# Altium PCB NB3000XN.PcbDoc (part 68 of 71)
Units mil, origin at the board's own origin, x right, y up, seen from the top; angles counter-clockwise.
Board outline 9527.56 x 6929.77 mil, 6 copper layers (Top Layer, GND+SHIELD, MidLayer1, MidLayer2, P2 - 3V3+5V0, Bottom Layer), stack 62.375 mil thick; 832 components, 1027 nets, 4655 pads, 4981 vias.
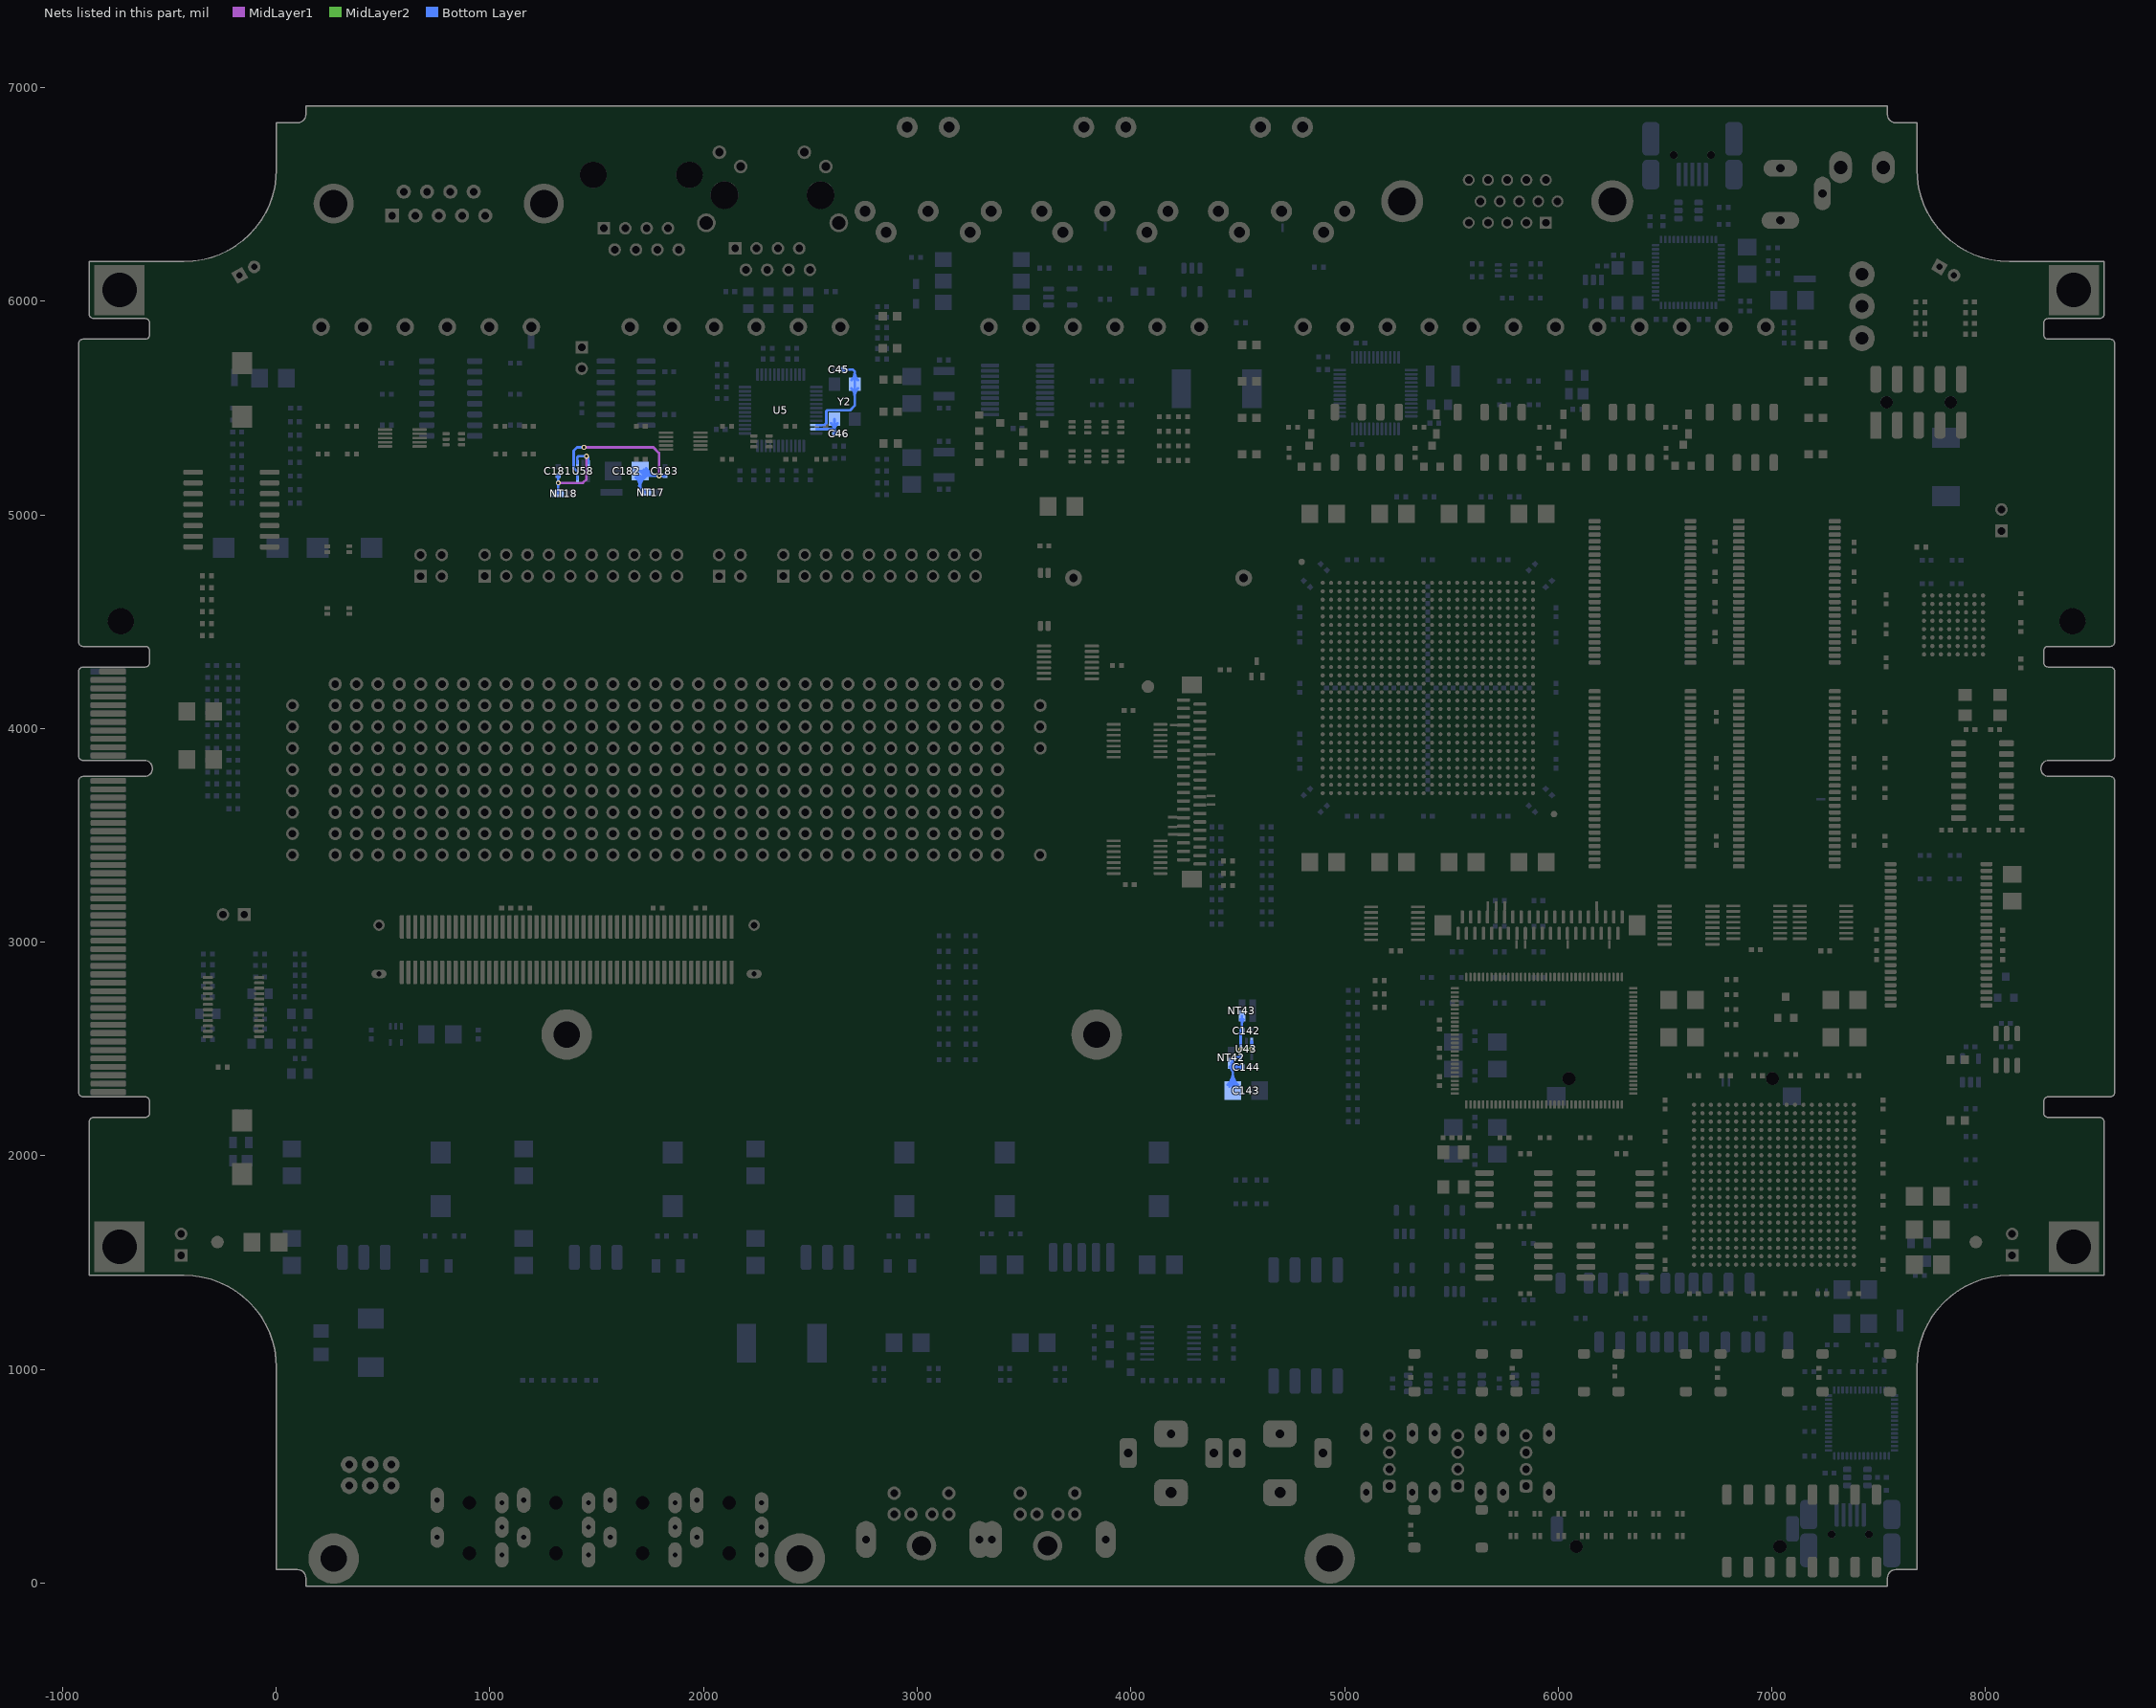
[diagram p72: the nets of this part, all layers, seen from the top]

## Via types
v1: diameter 23, hole 11.81, Top Layer to Bottom Layer, 3672 vias
v2: diameter 26, hole 11.81, Top Layer to Bottom Layer, 461 vias
v3: diameter 19, hole 11.81, Top Layer to Bottom Layer, tented both sides, 396 vias
v4: diameter 23.62, hole 11.81, Top Layer to Bottom Layer, 288 vias
v5: diameter 20, hole 11.81, Top Layer to Bottom Layer, 91 vias
v6: diameter 23, hole 11.81, Top Layer to Bottom Layer, tented both sides, 50 vias
v7: diameter 31, hole 11.81, Top Layer to Bottom Layer, 15 vias
v8: diameter 27.56, hole 11.81, Top Layer to Bottom Layer, tented both sides, 4 vias
v9: diameter 29, hole 11.81, Top Layer to Bottom Layer, 3 vias
v10: diameter 21, hole 11.81, Top Layer to Bottom Layer, 1 vias

## Nets (pads, with @x,y where several pads share a name; then routed paths per layer and width w, separated by ;. In a path a pad name is that pad's centre, name@x,y a point inside that pad or via, vN(x,y) a via of type N, cw(c..) or ccw(c..) an arc to the next point about the centre after c; other vN are vias at no path point) (continued)
VINA: C142.2 NT43.1 U43.1 U43.3 | length 405.5
  MidLayer2 w12: v1(4515.19,2500.04) v1(4565.19,2500.04) ; v1@4519.08,2496.15 cw(c4528.47,2486.76) 4528.47,2500.04 cw(c4528.47,2513.32) v1@4519.08,2503.93 ; v1@4561.3,2496.15 ccw(c4551.91,2486.76) 4551.91,2500.04 ccw(c4551.91,2513.32) v1@4561.3,2503.93
  Bottom Layer w12: NT43.1@4513.34,2637.78 cw(c4496.7,2621.14) 4520.24,2621.14 cw(c4543.77,2621.14) NT43.1@4527.13,2637.78 ; 4514.41,2515.2 ccw(c4530.35,2515.2) v1@4519.08,2503.93 ; 4514.41,2556.71 cw(c4548.6,2556.71) C142.2@4524.42,2580.89 ; v1(4515.19,2500.04) 4514.41,2500.82 U43.1@4514.41,2537.4 4514.41,2579.25 4520.24,2585.08 NT43.1@4520.24,2654.92 ; C142.2@4516.21,2589.11 ccw(c4506.48,2598.84) 4520.24,2598.84 ; 4520.24,2599.22 ccw(c4534.53,2599.22) C142.2@4524.42,2589.11 ; v1@4561.3,2503.93 ccw(c4550.95,2514.29) 4565.59,2514.29 ; v1@4565.59,2500.44 U43.3@4565.59,2537.4 ; 4565.59,2512.35 ccw(c4577.5,2512.35) v1@4569.08,2503.93
VINB: C181.2 NT18.1 U58.1 U58.3 | length 636.3
  MidLayer1 w12: v1(1319.92,5150.04) 1435.04,5150.04 1452.19,5167.19 v1(1452.19,5275.04) ; v1@1323.81,5146.15 cw(c1333.2,5136.76) 1333.2,5150.04 cw(c1333.2,5163.32) v1@1323.81,5153.93 ; v1@1448.3,5271.15 cw(c1438.91,5261.76) 1452.19,5261.76 cw(c1465.47,5261.76) v1@1456.08,5271.15
  Bottom Layer w12: NT18.1@1313.03,5106.66 ccw(c1296.2,5123.49) 1320,5123.49 ; C181.2@1315.89,5180.22 cw(c1305.97,5170.3) 1320,5170.3 cw(c1334.03,5170.3) C181.2@1324.11,5180.22 ; v1@1316.03,5146.15 cw(c1306.45,5136.57) 1320,5136.57 ; v1@1316.03,5153.93 ccw(c1306.45,5163.51) 1320,5163.51 ; NT18.1@1319.92,5099.76 1320,5099.84 1320,5150.04 C181.2@1320,5184.33 ; 1320,5123.11 ccw(c1343.27,5123.11) NT18.1@1326.81,5106.66 ; 1320,5136.95 cw(c1333.01,5136.95) v1@1323.81,5146.15 ; 1320,5163.13 ccw(c1333.01,5163.13) v1@1323.81,5153.93 ; U58.1@1409.41,5242.4 1409.41,5269.41 1415.04,5275.04 v1(1452.19,5275.04) 1460.59,5266.64 U58.3@1460.59,5242.4 ; v1@1448.3,5278.93 cw(c1438.91,5288.32) 1438.91,5275.04 cw(c1438.91,5261.76) 1448.3,5271.15 cw(c1418.63,5241.48) U58.3@1460.59,5241.48
VOUTA: C143.1 C144.2 NT42.2 U43.5 | length 639.8
  Bottom Layer w12: C143.1@4453.41,2332.53 ccw(c4396.45,2389.5) 4477.01,2389.5 ccw(c4557.57,2389.5) C143.1@4500.6,2332.53 ; C143.1@4461.9,2324.05 ccw(c4425.42,2360.53) 4477.01,2360.53 ccw(c4528.6,2360.53) C143.1@4492.12,2324.05 ; NT42.2@4462.87,2416.75 cw(c4428.74,2382.62) 4477.01,2382.62 ; NT42.2@4468.17,2422.05 ccw(c4485.2,2439.08) NT42.2@4485.2,2415 ; NT42.2@4470,2433.37 4488.37,2415 ; NT42.2@4471.29,2453.78 ccw(c4476.23,2484.83) 4498.46,2462.6 ; NT42.2@4473.11,2414.49 cw(c4479.73,2396.39) 4493.36,2410.02 ; NT42.2@4476.66,2430.54 ccw(c4514.17,2468.05) C144.2@4514.17,2415 ; C143.1@4477.01,2305 4477.01,2426.65 NT42.2@4469.76,2433.9 4498.46,2462.6 ; NT42.2@4479.51,2423.76 ccw(c4488.37,2423.86) 4488.37,2415 ; U43.5@4514.41,2462.6 4498.46,2462.6 ; C144.2@4516.21,2410.89 ccw(c4506.29,2400.97) 4506.29,2415 ccw(c4506.29,2429.03) C144.2@4516.21,2419.11 ; C144.2@4520.31,2415 4488.37,2415
VOUTB: C182.1 C183.2 NT17.2 U58.5 | length 1382.6
  MidLayer1 w12: v1(1440.19,5316.71) 1765.15,5316.71 1791.86,5290 v1(1791.86,5183.37) ; v1@1444.08,5312.82 cw(c1453.47,5303.43) 1453.47,5316.71 cw(c1453.47,5329.99) v1@1444.08,5320.6 ; v1@1787.97,5187.26 ccw(c1778.58,5196.65) 1791.86,5196.65 ccw(c1805.14,5196.65) v1@1795.75,5187.26
  Bottom Layer w12: U58.5@1409.41,5167.6 1409.41,5203.14 1392.52,5220.03 1392.52,5300.94 1408.29,5316.71 v1(1440.19,5316.71) ; v1@1436.3,5312.82 ccw(c1426.91,5303.43) 1426.91,5316.71 ccw(c1426.91,5329.99) v1@1436.3,5320.6 ; C182.1@1682.36,5175.23 cw(c1645.89,5130.65) 1703.48,5130.65 ; C182.1@1689.95,5184.52 cw(c1666.6,5155.97) 1703.48,5155.97 cw(c1740.37,5155.97) C182.1@1717.01,5184.52 ; 1698.36,5135.77 cw(c1672.38,5109.79) NT17.2@1708.94,5106.19 ; C182.1@1703.48,5183.37 1703.48,5130.65 ; C182.1@1703.48,5205 1724.15,5184.33 v1@1791.86,5184.33 ; C182.1@1711.52,5205.87 ccw(c1749.52,5228.61) 1749.52,5184.33 ; C182.1@1721.82,5212.04 ccw(c1770.69,5241.28) 1770.69,5184.33 ; C182.1@1724.61,5175.23 ccw(c1761.08,5130.65) 1703.48,5130.65 ; C182.1@1727.08,5177.47 cw(c1743.65,5160.9) 1743.65,5184.33 ; NT17.2@1728.9,5105.24 1703.48,5130.65 ; C182.1@1732.12,5218.2 ccw(c1791.85,5253.95) v1@1791.85,5184.33 ; 1776.27,5184.33 cw(c1776.27,5167.79) v1@1787.97,5179.49 ; v1@1795.75,5179.49 cw(c1807.44,5167.79) 1807.44,5184.33 ; C183.2@1815.89,5180.22 ccw(c1805.97,5170.3) 1805.97,5184.33 ccw(c1805.97,5198.36) C183.2@1815.89,5188.44 ; C183.2@1820,5184.33 v1@1791.86,5184.33
X1: C45.2 U5.46 Y2.1 | length 649.5
  Bottom Layer w12: U5.46@2528.19,5421.1 2566.1,5421.1 2575,5430 2575,5484.85 2580.15,5490 2685.85,5490 2707.5,5511.65 Y2.1@2707.5,5611.5 2707.5,5672 2699.5,5680 C45.2@2655.67,5680 ; C45.2@2659.78,5675.89 cw(c2669.7,5665.97) 2669.7,5680 cw(c2669.7,5694.03) C45.2@2659.78,5684.11 ; Y2.1@2692.3,5592.3 cw(c2655.59,5555.59) 2707.5,5555.59 cw(c2759.41,5555.59) Y2.1@2722.7,5592.3 ; Y2.1@2692.3,5630.7 ccw(c2655.59,5667.41) 2707.5,5667.41 ccw(c2759.41,5667.41) Y2.1@2722.7,5630.7
X2: C46.2 U5.47 Y2.3 | length 251.3
  Bottom Layer w12: U5.47@2528.19,5401.42 2610.17,5401.42 2612,5399.59 ; Y2.3@2597.3,5429.3 cw(c2560.59,5392.59) 2612.5,5392.59 cw(c2664.41,5392.59) Y2.3@2627.7,5429.3 ; 2612.5,5398.45 ccw(c2632.78,5398.45) C46.2@2618.44,5384.11 ; Y2.3@2612.5,5448.5 2612.5,5381.83 C46.2@2614.33,5380
pads on no net: D1.2 D2.2 D7.3 FD1.0 FD2.0 FD3.0 J4.12 J4.13 J5.10 J5.11 J5.12 J5.13 J6.10 J6.12 J6.13 J7.12 J7.13 J8.7 J8.MH3 J8.MH4 J9.4 J9.X J9.Y J10.4 J10.X J10.Y J20.1 J20.2 J20.3 J21.1 J21.3 J22.1 J22.3 J23.4 J23.5 J23.7 J23.8 J23.MH1 J23.MH2 J25.PEGA J25.PEGB J27.41 J27.42 J28.41 J28.42 J29.MH1 J29.MH2 J30.MH1 J30.MH2 J31.2 J31.6 J32.2 J32.6 PROTOTYPE1.7 PROTOTYPE1.8 PROTOTYPE1.9 PROTOTYPE1.10 PROTOTYPE1.11 PROTOTYPE1.12 PROTOTYPE1.13 PROTOTYPE1.14 PROTOTYPE1.15 PROTOTYPE1.16 PROTOTYPE1.17 PROTOTYPE1.18 PROTOTYPE1.19 PROTOTYPE1.20 PROTOTYPE1.21 PROTOTYPE1.22 PROTOTYPE1.23 PROTOTYPE1.24 PROTOTYPE1.25 PROTOTYPE1.26 PROTOTYPE1.A2 PROTOTYPE1.A3 PROTOTYPE1.A4 PROTOTYPE1.A5 PROTOTYPE1.A6 PROTOTYPE1.A7 PROTOTYPE1.A8 PROTOTYPE1.A9 PROTOTYPE1.A10 PROTOTYPE1.A11 PROTOTYPE1.A12 PROTOTYPE1.A13 PROTOTYPE1.A14 PROTOTYPE1.A15 PROTOTYPE1.A16 PROTOTYPE1.A17 PROTOTYPE1.A18 PROTOTYPE1.A19 PROTOTYPE1.A20 PROTOTYPE1.A21 PROTOTYPE1.A22 PROTOTYPE1.A23 PROTOTYPE1.A24 PROTOTYPE1.A25 PROTOTYPE1.A26 PROTOTYPE1.A27 PROTOTYPE1.A28 PROTOTYPE1.A29 PROTOTYPE1.A30 PROTOTYPE1.A31 PROTOTYPE1.B2 PROTOTYPE1.B3 PROTOTYPE1.B4 PROTOTYPE1.B5 PROTOTYPE1.B6 PROTOTYPE1.B7 PROTOTYPE1.B8 PROTOTYPE1.B9 PROTOTYPE1.B10 PROTOTYPE1.B11 PROTOTYPE1.B12 PROTOTYPE1.B13 PROTOTYPE1.B14 PROTOTYPE1.B15 PROTOTYPE1.B16 PROTOTYPE1.B17 PROTOTYPE1.B18 PROTOTYPE1.B19 PROTOTYPE1.B20 PROTOTYPE1.B21 PROTOTYPE1.B22 PROTOTYPE1.B23 PROTOTYPE1.B24 PROTOTYPE1.B25 PROTOTYPE1.B26 PROTOTYPE1.B27 PROTOTYPE1.B28 PROTOTYPE1.B29 PROTOTYPE1.B30 PROTOTYPE1.B31 PROTOTYPE1.C1 PROTOTYPE1.C2 PROTOTYPE1.C3 PROTOTYPE1.C4 PROTOTYPE1.C5 PROTOTYPE1.C6 PROTOTYPE1.C7 PROTOTYPE1.C8 PROTOTYPE1.C9 PROTOTYPE1.C10 PROTOTYPE1.C11 PROTOTYPE1.C12 PROTOTYPE1.C13 PROTOTYPE1.C14 PROTOTYPE1.C15 PROTOTYPE1.C16 PROTOTYPE1.C17 PROTOTYPE1.C18 PROTOTYPE1.C19 PROTOTYPE1.C20 PROTOTYPE1.C21 PROTOTYPE1.C22 PROTOTYPE1.C23 PROTOTYPE1.C24 PROTOTYPE1.C25 PROTOTYPE1.C26 PROTOTYPE1.C27 PROTOTYPE1.C28 PROTOTYPE1.C29 PROTOTYPE1.C30 PROTOTYPE1.C31 PROTOTYPE1.C32 PROTOTYPE1.D1 PROTOTYPE1.D2 PROTOTYPE1.D3 PROTOTYPE1.D4 PROTOTYPE1.D5 PROTOTYPE1.D6 PROTOTYPE1.D7 PROTOTYPE1.D8 PROTOTYPE1.D9 PROTOTYPE1.D10 PROTOTYPE1.D11 PROTOTYPE1.D12 PROTOTYPE1.D13 PROTOTYPE1.D14 PROTOTYPE1.D15 PROTOTYPE1.D16 PROTOTYPE1.D17 PROTOTYPE1.D18 PROTOTYPE1.D19 PROTOTYPE1.D20 PROTOTYPE1.D21 PROTOTYPE1.D22 PROTOTYPE1.D23 PROTOTYPE1.D24 PROTOTYPE1.D25 PROTOTYPE1.D26 PROTOTYPE1.D27 PROTOTYPE1.D28 PROTOTYPE1.D29 PROTOTYPE1.D30 PROTOTYPE1.D31 PROTOTYPE1.D32 PROTOTYPE1.E1 PROTOTYPE1.E2 PROTOTYPE1.E3 PROTOTYPE1.E4 PROTOTYPE1.E5 PROTOTYPE1.E6 PROTOTYPE1.E7 PROTOTYPE1.E8 PROTOTYPE1.E9 PROTOTYPE1.E10 PROTOTYPE1.E11 PROTOTYPE1.E12 PROTOTYPE1.E13 PROTOTYPE1.E14 PROTOTYPE1.E15 PROTOTYPE1.E16 PROTOTYPE1.E17 PROTOTYPE1.E18 PROTOTYPE1.E19 PROTOTYPE1.E20 PROTOTYPE1.E21 PROTOTYPE1.E22 PROTOTYPE1.E23 PROTOTYPE1.E24 PROTOTYPE1.E25 PROTOTYPE1.E26 PROTOTYPE1.E27 PROTOTYPE1.E28 PROTOTYPE1.E29 PROTOTYPE1.E30 PROTOTYPE1.E31 PROTOTYPE1.E32 PROTOTYPE1.F1 PROTOTYPE1.F2 PROTOTYPE1.F3 PROTOTYPE1.F4 PROTOTYPE1.F5 PROTOTYPE1.F6 PROTOTYPE1.F7 PROTOTYPE1.F8 PROTOTYPE1.F9 PROTOTYPE1.F10 PROTOTYPE1.F11 PROTOTYPE1.F12 PROTOTYPE1.F13 PROTOTYPE1.F14 PROTOTYPE1.F15 PROTOTYPE1.F16 PROTOTYPE1.F17 PROTOTYPE1.F18 PROTOTYPE1.F19 PROTOTYPE1.F20 PROTOTYPE1.F21 PROTOTYPE1.F22 PROTOTYPE1.F23 PROTOTYPE1.F24 PROTOTYPE1.F25 PROTOTYPE1.F26 PROTOTYPE1.F27 PROTOTYPE1.F28 PROTOTYPE1.F29 PROTOTYPE1.F30 PROTOTYPE1.F31 PROTOTYPE1.F32 PROTOTYPE1.G1 PROTOTYPE1.G2 PROTOTYPE1.G3 PROTOTYPE1.G4 PROTOTYPE1.G5 PROTOTYPE1.G6 PROTOTYPE1.G7 PROTOTYPE1.G8 PROTOTYPE1.G9 PROTOTYPE1.G10 PROTOTYPE1.G11 PROTOTYPE1.G12 PROTOTYPE1.G13 PROTOTYPE1.G14 PROTOTYPE1.G15 PROTOTYPE1.G16 PROTOTYPE1.G17 PROTOTYPE1.G18 PROTOTYPE1.G19 PROTOTYPE1.G20 PROTOTYPE1.G21 PROTOTYPE1.G22 PROTOTYPE1.G23 PROTOTYPE1.G24 PROTOTYPE1.G25 PROTOTYPE1.G26 PROTOTYPE1.G27 PROTOTYPE1.G28 PROTOTYPE1.G29 PROTOTYPE1.G30 PROTOTYPE1.G31 PROTOTYPE1.G32 SW1.1 SW1.4 SW2.1 SW2.4 SW3.1 SW3.4 SW4.1 SW4.4 SW5.1 SW5.4 T1.2 T1.3 T1.6 T1.7 U2.2 U2.4 U2.7 U2.10 U2.14 U2.15 U3.6 U3.12 U4.1 U5.27 U6.3 U6.5 U6.7 U6.9 U6.16 U6.18 U7.A1 U7.A8 U7.B1 U7.B4 U7.C1 U7.D1 U7.E1 U7.F8 U7.G1 U7.G8 U7.H1 U7.H8 U8.A13 U8.A17 U8.A23 U8.A24 U8.AA4 U8.AA5 U8.AA8 U8.AB3 U8.AC5 U8.AC22 U8.AD5 U8.AD16 U8.AD23 U8.AE1 U8.B24 U8.B25 U8.D5 U8.D12 U8.D14 U8.D15 U8.D19 U8.E6 U8.E9 U8.E11 U8.E12 U8.E18 U8.E20 U8.F9 U8.F10 U8.F18 U8.FID1 U8.G11 U8.G14 U8.G16 U8.G18 U8.G25 U8.G26 U8.H13 U8.H18 U8.H23 U8.H24 U8.H25 U8.H26 U8.J3 U8.J10 U8.J13 U8.J15 U8.J17 U8.K24 U8.L23 U8.M24 U8.N23 U8.N25 U8.N26 U8.R23 U8.U25 U8.U26 U8.V26 U8.W18 U8.Y3 U8.Y4 U8.Y8 U8.Y11 U8.Y16 U8.Y18 U8.Y19 U12.40 U13.40 U18.3 U18.4 U19.54 U21.9 U21.10 U21.13 U21.14 U21.35 U21.36 U23.3 U23.5 U23.6 U27.3 U27.4 U27.11 U30.A15 U30.A16 U30.A17 U30.A18 U30.B15 U30.B17 U30.B18 U30.B19 U30.B20 U30.C14 U30.C15 U30.C16 U30.C17 U30.C19 U30.C20 U30.D12 U30.D14 U30.D15 U30.D16 U30.D17 U30.D18 U30.D20 U30.E13 U30.E14 U30.E15 U30.E18 U30.E19 U30.F11 U30.F12 U30.F13 U30.F14 U30.F16 U30.F17 U30.F18 U30.F19 U30.G6 U30.G7 U30.G8 U30.G9 U30.G10 U30.G11 U30.G12 U30.G13 U30.G14 U30.G15 U30.G16 U30.G17 U30.G18 U30.G20 U30.H7 U30.H9 U30.H10 U30.H11 U30.H12 U30.H14 U30.H15 U30.H17 U30.H18 U30.H19 U30.H20 U30.J7 U30.J8 U30.J13 U30.J14 U30.J15 U30.J16 U30.J17 U30.J18 U30.J19 U30.J20 U30.K5 U30.K6 U30.K7 U30.K8 U30.K14 U30.K15 U30.K16 U30.K18 U30.K20 U30.L6 U30.L7 U30.L13 U30.L14 U30.L15 U30.L16 U30.L17 U30.L18 U30.L19 U30.M6 U30.M7 U30.M8 U30.M13 U30.M14 U30.M15 U30.M16 U30.M17 U30.M18 U30.M19 U30.M20 U30.N6 U30.N7 U30.N9 U30.N12 U30.N14 U30.N15 U30.N17 U30.N18 U30.N19 U30.P5 U30.P6 U30.P7 U30.P8 U30.P9 U30.P10 U30.P11 U30.P12 U30.P13 U30.P14 U30.P15 U30.P16 U30.P17 U30.P18 U30.R8 U30.R10 U30.R14 U30.R16 U30.R17 U30.R18 U30.R19 U30.R20 U30.T11 U30.T18 U36.3 U36.6 U37.1 U38.1 U43.4 U44.4 U46.1 U46.8 U46.13 U54.1 U55.3 U55.4 U56.54 U58.4 U61.21 U61.28 U61.35 U61.111 U61.113 U62.3 U62.4 U63.3 U63.4 U64.3 U64.4 U65.1 U66.1 U67.1 U68.1 VR1.4 VR1.5 VR1.6
copper on no net: | length 31146.2
  Top Layer w4: 4870,3737.24 4897.87,3737.24 ; 4870,4391.03 4936.73,4391.03 cw(c4936.73,4352.35) 4964.08,4379.7 ; 4892.57,3731.94 ccw(c4879.77,3719.14) 4879.77,3737.24 ccw(c4879.77,3755.35) 4892.57,3742.55 ; 4892.68,3732.05 ccw(c4880.15,3719.52) 4880.15,3737.24 ccw(c4880.15,3754.97) 4892.68,3742.44 ; 4969.27,4367.17 ccw(c4951.55,4367.17) 4964.08,4379.7 ; 4976.61,4374.51 cw(c4976.61,4392.23) 4964.08,4379.7 ; v3(4996.3,3875.04) 5015.98,3894.72 ; v3(4996.3,3914.41) 5015.98,3934.09 ; 5008.48,3894.72 cw(c4990.38,3894.72) 5003.18,3881.92 cw(c5015.98,3869.12) 5015.98,3887.22 ; 5008.48,3934.09 cw(c4990.38,3934.09) 5003.18,3921.29 cw(c5015.98,3908.49) 5015.98,3926.59 ; 5008.64,3894.72 cw(c4990.92,3894.72) 5003.45,3882.19 cw(c5015.98,3869.66) 5015.98,3887.38 ; 5008.64,3934.09 cw(c4990.92,3934.09) 5003.45,3921.56 cw(c5015.98,3909.03) 5015.98,3926.75 ; v3(5035.67,3796.3) 5055.35,3815.98 ; v3(5035.67,3875.04) 5055.35,3894.72 ; v3(5035.67,4583.7) 5055.35,4564.02 ; 5047.85,3815.98 cw(c5029.75,3815.98) 5042.55,3803.18 cw(c5055.35,3790.38) 5055.35,3808.48 ; 5047.85,3894.72 cw(c5029.75,3894.72) 5042.55,3881.92 cw(c5055.35,3869.12) 5055.35,3887.22 ; 5047.85,4564.02 ccw(c5029.75,4564.02) 5042.55,4576.82 ccw(c5055.35,4589.62) 5055.35,4571.52 ; 5048.01,3815.98 cw(c5030.29,3815.98) 5042.82,3803.45 cw(c5055.35,3790.92) 5055.35,3808.64 ; 5048.01,3894.72 cw(c5030.29,3894.72) 5042.82,3882.19 cw(c5055.35,3869.66) 5055.35,3887.38 ; 5048.01,4564.02 ccw(c5030.29,4564.02) 5042.82,4576.55 ccw(c5055.35,4589.08) 5055.35,4571.36 ; v3(5075.04,4544.33) 5094.72,4524.65 ; 5087.22,4524.65 ccw(c5069.12,4524.65) 5081.92,4537.45 ccw(c5094.72,4550.25) 5094.72,4532.15 ; 5087.38,4524.65 ccw(c5069.66,4524.65) 5082.19,4537.18 ccw(c5094.72,4549.71) 5094.72,4531.99 ; v3(5153.78,3875.04) 5173.46,3894.72 ; v3(5153.78,3914.41) 5173.46,3934.09 ; 5165.96,3894.72 cw(c5147.86,3894.72) 5160.66,3881.92 cw(c5173.46,3869.12) 5173.46,3887.22 ; 5165.96,3934.09 cw(c5147.86,3934.09) 5160.66,3921.29 cw(c5173.46,3908.49) 5173.46,3926.59 ; 5166.12,3894.72 cw(c5148.4,3894.72) 5160.93,3882.19 cw(c5173.46,3869.66) 5173.46,3887.38 ; 5166.12,3934.09 cw(c5148.4,3934.09) 5160.93,3921.56 cw(c5173.46,3909.03) 5173.46,3926.75 ; v3(5193.15,4504.96) 5212.83,4485.28 ; v3(5193.15,4544.33) 5212.83,4524.65 ; 5205.33,4485.28 ccw(c5187.23,4485.28) 5200.03,4498.08 ccw(c5212.83,4510.88) 5212.83,4492.78 ; 5205.33,4524.65 ccw(c5187.23,4524.65) 5200.03,4537.45 ccw(c5212.83,4550.25) 5212.83,4532.15 ; 5205.49,4485.28 ccw(c5187.77,4485.28) 5200.3,4497.81 ccw(c5212.83,4510.34) 5212.83,4492.62 ; 5205.49,4524.65 ccw(c5187.77,4524.65) 5200.3,4537.18 ccw(c5212.83,4549.71) 5212.83,4531.99 ; v3(5232.52,4386.85) 5252.2,4367.17 ; v3(5232.52,4504.96) 5252.2,4485.28 ; 5244.7,4367.17 ccw(c5226.6,4367.17) 5239.4,4379.97 ccw(c5252.2,4392.77) 5252.2,4374.67 ; 5244.7,4485.28 ccw(c5226.6,4485.28) 5239.4,4498.08 ccw(c5252.2,4510.88) 5252.2,4492.78 ; 5244.86,4367.17 ccw(c5227.14,4367.17) 5239.67,4379.7 ccw(c5252.2,4392.23) 5252.2,4374.51 ; 5244.86,4485.28 ccw(c5227.14,4485.28) 5239.67,4497.81 ccw(c5252.2,4510.34) 5252.2,4492.62 ; v3(5271.89,3914.41) 5291.57,3934.09 ; v3(5271.89,4465.59) 5291.57,4445.91 ; v3(5271.89,4544.33) 5291.57,4524.65 ; 5284.07,3934.09 cw(c5265.97,3934.09) 5278.77,3921.29 cw(c5291.57,3908.49) 5291.57,3926.59 ; 5284.07,4445.91 ccw(c5265.97,4445.91) 5278.77,4458.71 ccw(c5291.57,4471.51) 5291.57,4453.41 ; 5284.07,4524.65 ccw(c5265.97,4524.65) 5278.77,4537.45 ccw(c5291.57,4550.25) 5291.57,4532.15 ; 5284.23,3934.09 cw(c5266.51,3934.09) 5279.04,3921.56 cw(c5291.57,3909.03) 5291.57,3926.75 ; 5284.23,4445.91 ccw(c5266.51,4445.91) 5279.04,4458.44 ccw(c5291.57,4470.97) 5291.57,4453.25 ; 5284.23,4524.65 ccw(c5266.51,4524.65) 5279.04,4537.18 ccw(c5291.57,4549.71) 5291.57,4531.99 ; v3(5311.26,4544.33) 5330.94,4524.65 ; v3(5311.26,4583.7) 5330.94,4564.02 ; 5323.44,4524.65 ccw(c5305.34,4524.65) 5318.14,4537.45 ccw(c5330.94,4550.25) 5330.94,4532.15 ; 5323.44,4564.02 ccw(c5305.34,4564.02) 5318.14,4576.82 ccw(c5330.94,4589.62) 5330.94,4571.52 ; 5323.6,4524.65 ccw(c5305.88,4524.65) 5318.41,4537.18 ccw(c5330.94,4549.71) 5330.94,4531.99 ; 5323.6,4564.02 ccw(c5305.88,4564.02) 5318.41,4576.55 ccw(c5330.94,4589.08) 5330.94,4571.36 ; v3(5350.63,4386.85) 5370.31,4367.17 ; v3(5350.63,4426.22) 5370.31,4406.54 ; 5362.81,4367.17 ccw(c5344.71,4367.17) 5357.51,4379.97 ccw(c5370.31,4392.77) 5370.31,4374.67 ; 5362.81,4406.54 ccw(c5344.71,4406.54) 5357.51,4419.34 ccw(c5370.31,4432.14) 5370.31,4414.04 ; 5362.97,4367.17 ccw(c5345.25,4367.17) 5357.78,4379.7 ccw(c5370.31,4392.23) 5370.31,4374.51 ; 5362.97,4406.54 ccw(c5345.25,4406.54) 5357.78,4419.07 ccw(c5370.31,4431.6) 5370.31,4413.88 ; 5365.01,4687.43 ccw(c5352.21,4700.23) 5370.31,4700.23 ccw(c5388.42,4700.23) 5375.62,4687.43 ; 5365.12,4687.32 ccw(c5352.59,4699.85) 5370.31,4699.85 ccw(c5388.04,4699.85) 5375.51,4687.32 ; 5370.31,4682.13 5370.31,4710 ; 5409.69,4445.91 v3(5429.37,4465.59) ; 5409.69,4453.25 ccw(c5409.69,4470.97) 5422.22,4458.44 ccw(c5434.75,4445.91) 5417.03,4445.91 ; 5409.69,4453.41 ccw(c5409.69,4471.51) 5422.49,4458.71 ccw(c5435.29,4445.91) 5417.19,4445.91 ; 5409.69,4564.02 v3(5429.37,4583.7) ; 5409.69,4571.36 ccw(c5409.69,4589.08) 5422.22,4576.55 ccw(c5434.75,4564.02) 5417.03,4564.02 ; 5409.69,4571.52 ccw(c5409.69,4589.62) 5422.49,4576.82 ccw(c5435.29,4564.02) 5417.19,4564.02 ; 5449.06,4367.17 v3(5468.74,4386.85) ; 5449.06,4374.51 ccw(c5449.06,4392.23) 5461.59,4379.7 ccw(c5474.12,4367.17) 5456.4,4367.17 ; 5449.06,4374.67 ccw(c5449.06,4392.77) 5461.86,4379.97 ccw(c5474.66,4367.17) 5456.56,4367.17 ; 5449.06,4564.02 v3(5468.74,4583.7) ; 5449.06,4571.36 ccw(c5449.06,4589.08) 5461.59,4576.55 ccw(c5474.12,4564.02) 5456.4,4564.02 ; 5449.06,4571.52 ccw(c5449.06,4589.62) 5461.86,4576.82 ccw(c5474.66,4564.02) 5456.56,4564.02 ; 5488.43,3769.27 cw(c5488.43,3751.55) 5500.96,3764.08 ; 5488.43,3926.59 cw(c5488.43,3908.49) 5501.23,3921.29 cw(c5514.03,3934.09) 5495.93,3934.09 ; 5488.43,3926.75 cw(c5488.43,3909.03) 5500.96,3921.56 cw(c5513.49,3934.09) 5495.77,3934.09 ; 5488.43,3934.09 v3(5508.11,3914.41) ; 5488.43,4445.91 v3(5508.11,4465.59) ; 5488.43,4453.25 ccw(c5488.43,4470.97) 5500.96,4458.44 ccw(c5513.49,4445.91) 5495.77,4445.91 ; 5488.43,4453.41 ccw(c5488.43,4471.51) 5501.23,4458.71 ccw(c5514.03,4445.91) 5495.93,4445.91 ; 5495.77,3776.61 ccw(c5513.49,3776.61) 5500.96,3764.08 ; 5512.29,3670 5512.29,3736.73 ccw(c5473.61,3736.73) 5500.96,3764.08 ; 5527.8,4367.17 v3(5547.48,4386.85) ; 5527.8,4374.51 ccw(c5527.8,4392.23) 5540.33,4379.7 ccw(c5552.86,4367.17) 5535.14,4367.17 ; 5527.8,4374.67 ccw(c5527.8,4392.77) 5540.6,4379.97 ccw(c5553.4,4367.17) 5535.3,4367.17 ; 5567.17,3926.59 cw(c5567.17,3908.49) 5579.97,3921.29 cw(c5592.77,3934.09) 5574.67,3934.09 ; 5567.17,3926.75 cw(c5567.17,3909.03) 5579.7,3921.56 cw(c5592.23,3934.09) 5574.51,3934.09 ; 5567.17,3934.09 v3(5586.85,3914.41) ; 5567.17,3965.96 cw(c5567.17,3947.86) 5579.97,3960.66 cw(c5592.77,3973.46) 5574.67,3973.46 ; 5567.17,3966.12 cw(c5567.17,3948.4) 5579.7,3960.93 cw(c5592.23,3973.46) 5574.51,3973.46 ; 5567.17,3973.46 v3(5586.85,3953.78) ; 5567.17,4406.54 v3(5586.85,4426.22) ; 5567.17,4413.88 ccw(c5567.17,4431.6) 5579.7,4419.07 ccw(c5592.23,4406.54) 5574.51,4406.54 ; 5567.17,4414.04 ccw(c5567.17,4432.14) 5579.97,4419.34 ccw(c5592.77,4406.54) 5574.67,4406.54 ; 5567.17,4445.91 v3(5586.85,4465.59) ; 5567.17,4453.25 ccw(c5567.17,4470.97) 5579.7,4458.44 ccw(c5592.23,4445.91) 5574.51,4445.91 ; 5567.17,4453.41 ccw(c5567.17,4471.51) 5579.97,4458.71 ccw(c5592.77,4445.91) 5574.67,4445.91 ; 5567.17,4485.28 v3(5586.85,4504.96) ; 5567.17,4492.62 ccw(c5567.17,4510.34) 5579.7,4497.81 ccw(c5592.23,4485.28) 5574.51,4485.28 ; 5567.17,4492.78 ccw(c5567.17,4510.88) 5579.97,4498.08 ccw(c5592.77,4485.28) 5574.67,4485.28 ; 5567.17,4524.65 v3(5586.85,4544.33) ; 5567.17,4531.99 ccw(c5567.17,4549.71) 5579.7,4537.18 ccw(c5592.23,4524.65) 5574.51,4524.65 ; 5567.17,4532.15 ccw(c5567.17,4550.25) 5579.97,4537.45 ccw(c5592.77,4524.65) 5574.67,4524.65 ; 5606.54,3926.59 cw(c5606.54,3908.49) 5619.34,3921.29 cw(c5632.14,3934.09) 5614.04,3934.09 ; 5606.54,3926.75 cw(c5606.54,3909.03) 5619.07,3921.56 cw(c5631.6,3934.09) 5613.88,3934.09 ; 5606.54,3934.09 v3(5626.22,3914.41) ; 5606.54,4564.02 v3(5626.22,4583.7) ; 5606.54,4571.36 ccw(c5606.54,4589.08) 5619.07,4576.55 ccw(c5631.6,4564.02) 5613.88,4564.02 ; 5606.54,4571.52 ccw(c5606.54,4589.62) 5619.34,4576.82 ccw(c5632.14,4564.02) 5614.04,4564.02 ; 5645.91,4524.65 v3(5665.59,4544.33) ; 5645.91,4531.99 ccw(c5645.91,4549.71) 5658.44,4537.18 ccw(c5670.97,4524.65) 5653.25,4524.65 ; 5645.91,4532.15 ccw(c5645.91,4550.25) 5658.71,4537.45 ccw(c5671.51,4524.65) 5653.41,4524.65 ; 5724.65,3808.48 cw(c5724.65,3790.38) 5737.45,3803.18 cw(c5750.25,3815.98) 5732.15,3815.98 ; 5724.65,3808.64 cw(c5724.65,3790.92) 5737.18,3803.45 cw(c5749.71,3815.98) 5731.99,3815.98 ; 5724.65,3815.98 v3(5744.33,3796.3) ; 5758.71,4687.43 ccw(c5745.91,4700.23) 5764.02,4700.23 ccw(c5782.12,4700.23) 5769.32,4687.43 ; 5758.82,4687.32 ccw(c5746.29,4699.85) 5764.02,4699.85 ccw(c5781.74,4699.85) 5769.21,4687.32 ; 5764.02,4123.44 cw(c5764.02,4105.34) 5776.82,4118.14 cw(c5789.62,4130.94) 5771.52,4130.94 ; 5764.02,4123.6 cw(c5764.02,4105.88) 5776.55,4118.41 cw(c5789.08,4130.94) 5771.36,4130.94 ; 5764.02,4130.94 v3(5783.7,4111.26) ; 5764.02,4209.69 v3(5783.7,4229.37) ; 5764.02,4217.03 ccw(c5764.02,4234.75) 5776.55,4222.22 ccw(c5789.08,4209.69) 5771.36,4209.69 ; 5764.02,4217.19 ccw(c5764.02,4235.29) 5776.82,4222.49 ccw(c5789.62,4209.69) 5771.52,4209.69 ; 5764.02,4288.43 v3(5783.7,4308.11) ; 5764.02,4295.77 ccw(c5764.02,4313.49) 5776.55,4300.96 ccw(c5789.08,4288.43) 5771.36,4288.43 ; 5764.02,4295.93 ccw(c5764.02,4314.03) 5776.82,4301.23 ccw(c5789.62,4288.43) 5771.52,4288.43 ; 5764.02,4406.54 v3(5783.7,4426.22) ; 5764.02,4413.88 ccw(c5764.02,4431.6) 5776.55,4419.07 ccw(c5789.08,4406.54) 5771.36,4406.54 ; 5764.02,4414.04 ccw(c5764.02,4432.14) 5776.82,4419.34 ccw(c5789.62,4406.54) 5771.52,4406.54 ; 5764.02,4682.13 5764.02,4710 ; 5798.08,4687.43 ccw(c5785.28,4700.23) 5803.39,4700.23 ccw(c5821.49,4700.23) 5808.69,4687.43 ; 5798.19,4687.32 ccw(c5785.66,4699.85) 5803.39,4699.85 ccw(c5821.11,4699.85) 5808.58,4687.32 ; 5803.39,4256.4 ccw(c5803.39,4274.12) 5815.92,4261.59 ; 5803.39,4413.88 ccw(c5803.39,4431.6) 5815.92,4419.07 ; 5803.39,4682.13 5803.39,4710 ; 5810.73,4249.06 cw(c5828.45,4249.06) 5815.92,4261.59 ; 5810.73,4406.54 cw(c5828.45,4406.54) 5815.92,4419.07 ; 5842.76,4217.03 ccw(c5842.76,4234.75) 5855.29,4222.22 ; 5842.76,4413.88 ccw(c5842.76,4431.6) 5855.29,4419.07 ; 5850.1,4209.69 cw(c5867.83,4209.69) 5855.29,4222.22 ; 5850.1,4406.54 cw(c5867.83,4406.54) 5855.29,4419.07 ; 5882.13,4012.83 5910,4012.83 ; 5882.13,4209.69 5910,4209.69 ; 5882.13,4406.54 5910,4406.54 ; 5887.32,4007.64 cw(c5899.85,3995.11) 5899.85,4012.83 cw(c5899.85,4030.56) 5887.32,4018.03 ; 5887.32,4204.49 cw(c5899.85,4191.96) 5899.85,4209.69 cw(c5899.85,4227.41) 5887.32,4214.88 ; 5887.32,4401.34 cw(c5899.85,4388.81) 5899.85,4406.54 cw(c5899.85,4424.26) 5887.32,4411.73 ; 5887.43,4007.53 cw(c5900.23,3994.73) 5900.23,4012.83 cw(c5900.23,4030.94) 5887.43,4018.14 ; 5887.43,4204.38 cw(c5900.23,4191.58) 5900.23,4209.69 cw(c5900.23,4227.79) 5887.43,4214.99 ; 5887.43,4401.23 cw(c5900.23,4388.43) 5900.23,4406.54 cw(c5900.23,4424.64) 5887.43,4411.84 ; 5910,4225.19 5862.47,4225.19 ccw(c5862.47,4215.04) 5855.29,4222.22 ; 5910,4272.92 5843.27,4272.92 ccw(c5843.27,4234.24) 5815.92,4261.59 ; 5910,4422.04 5862.47,4422.04 ccw(c5862.47,4411.89) 5855.29,4419.07 ; 5910,4430.4 5843.27,4430.4 ccw(c5843.27,4391.72) 5815.92,4419.07 ; 4936.73,3831.49 ccw(c4936.73,3870.17) 4964.08,3842.82 ; 4936.73,3831.49 ccw(c4936.73,3870.17) 4964.08,3842.82 ; 4936.73,3831.49 4870,3831.49 4936.73,3831.49 ; 4936.73,3910.23 ccw(c4936.73,3948.91) 4964.08,3921.56 ; 4936.73,3910.23 ccw(c4936.73,3948.91) 4964.08,3921.56 ; 4936.73,3910.23 4870,3910.23 4936.73,3910.23 ; 4964.08,3842.82 cw(c4976.61,3830.29) 4976.61,3848.01 ccw(c4976.61,3830.29) 4964.08,3842.82 ; 4964.08,3842.82 ccw(c4951.55,3855.35) 4969.27,3855.35 cw(c4951.55,3855.35) 4964.08,3842.82 ; 4964.08,3921.56 cw(c4976.61,3909.03) 4976.61,3926.75 ccw(c4976.61,3909.03) 4964.08,3921.56 ; 4964.08,3921.56 ccw(c4951.55,3934.09) 4969.27,3934.09 cw(c4951.55,3934.09) 4964.08,3921.56 ; 5009.1,3887.84 ccw(c5021.91,3875.04) 5003.8,3875.04 cw(c5021.91,3875.04) 5009.1,3887.84 ; 5009.1,3887.84 cw(c4996.3,3900.65) 4996.3,3882.54 ccw(c4996.3,3900.65) 5009.1,3887.84 ; 5009.1,3927.21 cw(c4996.3,3940.02) 4996.3,3921.91 ccw(c4996.3,3940.02) 5009.1,3927.21 ; 5009.1,3927.21 ccw(c5021.91,3914.41) 5003.8,3914.41 cw(c5021.91,3914.41) 5009.1,3927.21 ; 5031.49,3736.73 cw(c5070.17,3736.73) 5042.82,3764.08 ; 5031.49,3736.73 cw(c5070.17,3736.73) 5042.82,3764.08 ; 5031.49,3736.73 5031.49,3670 5031.49,3736.73 ; 5042.82,3764.08 ccw(c5030.29,3776.61) 5048.01,3776.61 cw(c5030.29,3776.61) 5042.82,3764.08 ; 5042.82,3764.08 cw(c5055.35,3751.55) 5055.35,3769.27 ccw(c5055.35,3751.55) 5042.82,3764.08 ; 5048.47,3809.1 cw(c5035.67,3821.91) 5035.67,3803.8 ccw(c5035.67,3821.91) 5048.47,3809.1 ; 5048.47,3809.1 ccw(c5061.28,3796.3) 5043.17,3796.3 cw(c5061.28,3796.3) 5048.47,3809.1 ; 5048.47,3887.84 cw(c5035.67,3900.65) 5035.67,3882.54 ccw(c5035.67,3900.65) 5048.47,3887.84 ; 5048.47,3887.84 ccw(c5061.28,3875.04) 5043.17,3875.04 cw(c5061.28,3875.04) 5048.47,3887.84 ; 5048.47,4570.9 ccw(c5035.67,4558.09) 5035.67,4576.2 cw(c5035.67,4558.09) 5048.47,4570.9 ; 5048.47,4570.9 cw(c5061.28,4583.7) 5043.17,4583.7 ccw(c5061.28,4583.7) 5048.47,4570.9 ; 5087.84,4531.53 cw(c5100.65,4544.33) 5082.54,4544.33 ccw(c5100.65,4544.33) 5087.84,4531.53 ; 5087.84,4531.53 ccw(c5075.04,4518.72) 5075.04,4536.83 cw(c5075.04,4518.72) 5087.84,4531.53 ; 5166.58,3887.84 ccw(c5179.39,3875.04) 5161.28,3875.04 cw(c5179.39,3875.04) 5166.58,3887.84 ; 5166.58,3887.84 cw(c5153.78,3900.65) 5153.78,3882.54 ccw(c5153.78,3900.65) 5166.58,3887.84 ; 5166.58,3927.21 cw(c5153.78,3940.02) 5153.78,3921.91 ccw(c5153.78,3940.02) 5166.58,3927.21 ; 5166.58,3927.21 ccw(c5179.39,3914.41) 5161.28,3914.41 cw(c5179.39,3914.41) 5166.58,3927.21 ; 5205.95,4492.16 ccw(c5193.15,4479.35) 5193.15,4497.46 cw(c5193.15,4479.35) 5205.95,4492.16 ; 5205.95,4492.16 cw(c5218.76,4504.96) 5200.65,4504.96 ccw(c5218.76,4504.96) 5205.95,4492.16 ; 5205.95,4531.53 ccw(c5193.15,4518.72) 5193.15,4536.83 cw(c5193.15,4518.72) 5205.95,4531.53 ; 5205.95,4531.53 cw(c5218.76,4544.33) 5200.65,4544.33 ccw(c5218.76,4544.33) 5205.95,4531.53 ; 5245.32,4374.05 cw(c5258.13,4386.85) 5240.02,4386.85 ccw(c5258.13,4386.85) 5245.32,4374.05 ; 5245.32,4374.05 ccw(c5232.52,4361.24) 5232.52,4379.35 cw(c5232.52,4361.24) 5245.32,4374.05 ; 5245.32,4492.16 cw(c5258.13,4504.96) 5240.02,4504.96 ccw(c5258.13,4504.96) 5245.32,4492.16 ; 5245.32,4492.16 ccw(c5232.52,4479.35) 5232.52,4497.46 cw(c5232.52,4479.35) 5245.32,4492.16 ; 5284.69,3927.21 cw(c5271.89,3940.02) 5271.89,3921.91 ccw(c5271.89,3940.02) 5284.69,3927.21 ; 5284.69,3927.21 ccw(c5297.5,3914.41) 5279.39,3914.41 cw(c5297.5,3914.41) 5284.69,3927.21 ; 5284.69,4452.79 cw(c5297.5,4465.59) 5279.39,4465.59 ccw(c5297.5,4465.59) 5284.69,4452.79 ; 5284.69,4452.79 ccw(c5271.89,4439.98) 5271.89,4458.09 cw(c5271.89,4439.98) 5284.69,4452.79 ; 5284.69,4531.53 cw(c5297.5,4544.33) 5279.39,4544.33 ccw(c5297.5,4544.33) 5284.69,4531.53 ; 5284.69,4531.53 ccw(c5271.89,4518.72) 5271.89,4536.83 cw(c5271.89,4518.72) 5284.69,4531.53 ; 5324.06,4531.53 cw(c5336.87,4544.33) 5318.76,4544.33 ccw(c5336.87,4544.33) 5324.06,4531.53 ; 5324.06,4531.53 ccw(c5311.26,4518.72) 5311.26,4536.83 cw(c5311.26,4518.72) 5324.06,4531.53 ; 5324.06,4570.9 cw(c5336.87,4583.7) 5318.76,4583.7 ccw(c5336.87,4583.7) 5324.06,4570.9 ; 5324.06,4570.9 ccw(c5311.26,4558.09) 5311.26,4576.2 cw(c5311.26,4558.09) 5324.06,4570.9 ; 5363.43,4374.05 cw(c5376.24,4386.85) 5358.13,4386.85 ccw(c5376.24,4386.85) 5363.43,4374.05 ; 5363.43,4374.05 ccw(c5350.63,4361.24) 5350.63,4379.35 cw(c5350.63,4361.24) 5363.43,4374.05 ; 5363.43,4413.42 cw(c5376.24,4426.22) 5358.13,4426.22 ccw(c5376.24,4426.22) 5363.43,4413.42 ; 5363.43,4413.42 ccw(c5350.63,4400.61) 5350.63,4418.72 cw(c5350.63,4400.61) 5363.43,4413.42 ; 5416.57,4452.79 cw(c5429.37,4439.98) 5429.37,4458.09 ccw(c5429.37,4439.98) 5416.57,4452.79 ; 5416.57,4452.79 ccw(c5403.76,4465.59) 5421.87,4465.59 cw(c5403.76,4465.59) 5416.57,4452.79 ; 5416.57,4570.9 cw(c5429.37,4558.09) 5429.37,4576.2 ccw(c5429.37,4558.09) 5416.57,4570.9 ; 5416.57,4570.9 ccw(c5403.76,4583.7) 5421.87,4583.7 cw(c5403.76,4583.7) 5416.57,4570.9 ; 5455.94,4374.05 cw(c5468.74,4361.24) 5468.74,4379.35 ccw(c5468.74,4361.24) 5455.94,4374.05 ; 5455.94,4374.05 ccw(c5443.13,4386.85) 5461.24,4386.85 cw(c5443.13,4386.85) 5455.94,4374.05 ; 5455.94,4570.9 cw(c5468.74,4558.09) 5468.74,4576.2 ccw(c5468.74,4558.09) 5455.94,4570.9 ; 5455.94,4570.9 ccw(c5443.13,4583.7) 5461.24,4583.7 cw(c5443.13,4583.7) 5455.94,4570.9 ; 5495.31,3927.21 cw(c5482.5,3914.41) 5500.61,3914.41 ccw(c5482.5,3914.41) 5495.31,3927.21 ; 5495.31,3927.21 ccw(c5508.11,3940.02) 5508.11,3921.91 cw(c5508.11,3940.02) 5495.31,3927.21 ; 5495.31,4452.79 cw(c5508.11,4439.98) 5508.11,4458.09 ccw(c5508.11,4439.98) 5495.31,4452.79 ; 5495.31,4452.79 ccw(c5482.5,4465.59) 5500.61,4465.59 cw(c5482.5,4465.59) 5495.31,4452.79 ; 5527.8,4699.85 ccw(c5545.52,4699.85) 5532.99,4687.32 cw(c5545.52,4699.85) 5527.8,4699.85 ; 5527.8,4699.85 cw(c5510.07,4699.85) 5522.6,4687.32 ccw(c5510.07,4699.85) 5527.8,4699.85 ; 5527.8,4700.23 cw(c5509.69,4700.23) 5522.49,4687.43 ccw(c5509.69,4700.23) 5527.8,4700.23 ; 5527.8,4700.23 ccw(c5545.9,4700.23) 5533.1,4687.43 cw(c5545.9,4700.23) 5527.8,4700.23 ; 5534.68,4374.05 cw(c5547.48,4361.24) 5547.48,4379.35 ccw(c5547.48,4361.24) 5534.68,4374.05 ; 5534.68,4374.05 ccw(c5521.87,4386.85) 5539.98,4386.85 cw(c5521.87,4386.85) 5534.68,4374.05 ; 5574.05,3927.21 cw(c5561.24,3914.41) 5579.35,3914.41 ccw(c5561.24,3914.41) 5574.05,3927.21 ; 5574.05,3927.21 ccw(c5586.85,3940.02) 5586.85,3921.91 cw(c5586.85,3940.02) 5574.05,3927.21 ; 5574.05,3966.58 cw(c5561.24,3953.78) 5579.35,3953.78 ccw(c5561.24,3953.78) 5574.05,3966.58 ; 5574.05,3966.58 ccw(c5586.85,3979.39) 5586.85,3961.28 cw(c5586.85,3979.39) 5574.05,3966.58 ; 5574.05,4413.42 cw(c5586.85,4400.61) 5586.85,4418.72 ccw(c5586.85,4400.61) 5574.05,4413.42 ; 5574.05,4413.42 ccw(c5561.24,4426.22) 5579.35,4426.22 cw(c5561.24,4426.22) 5574.05,4413.42 ; 5574.05,4452.79 cw(c5586.85,4439.98) 5586.85,4458.09 ccw(c5586.85,4439.98) 5574.05,4452.79 ; 5574.05,4452.79 ccw(c5561.24,4465.59) 5579.35,4465.59 cw(c5561.24,4465.59) 5574.05,4452.79 ; 5574.05,4492.16 cw(c5586.85,4479.35) 5586.85,4497.46 ccw(c5586.85,4479.35) 5574.05,4492.16 ; 5574.05,4492.16 ccw(c5561.24,4504.96) 5579.35,4504.96 cw(c5561.24,4504.96) 5574.05,4492.16 ; 5574.05,4531.53 cw(c5586.85,4518.72) 5586.85,4536.83 ccw(c5586.85,4518.72) 5574.05,4531.53 ; 5574.05,4531.53 ccw(c5561.24,4544.33) 5579.35,4544.33 cw(c5561.24,4544.33) 5574.05,4531.53 ; 5613.42,3927.21 cw(c5600.61,3914.41) 5618.72,3914.41 ccw(c5600.61,3914.41) 5613.42,3927.21 ; 5613.42,3927.21 ccw(c5626.22,3940.02) 5626.22,3921.91 cw(c5626.22,3940.02) 5613.42,3927.21 ; 5613.42,4570.9 cw(c5626.22,4558.09) 5626.22,4576.2 ccw(c5626.22,4558.09) 5613.42,4570.9 ; 5613.42,4570.9 ccw(c5600.61,4583.7) 5618.72,4583.7 cw(c5600.61,4583.7) 5613.42,4570.9 ; 5652.79,4531.53 cw(c5665.59,4518.72) 5665.59,4536.83 ccw(c5665.59,4518.72) 5652.79,4531.53 ; 5652.79,4531.53 ccw(c5639.98,4544.33) 5658.09,4544.33 cw(c5639.98,4544.33) 5652.79,4531.53 ; 5731.53,3809.1 cw(c5718.72,3796.3) 5736.83,3796.3 ccw(c5718.72,3796.3) 5731.53,3809.1 ; 5731.53,3809.1 ccw(c5744.33,3821.91) 5744.33,3803.8 cw(c5744.33,3821.91) 5731.53,3809.1 ; 5770.9,4124.06 cw(c5758.09,4111.26) 5776.2,4111.26 ccw(c5758.09,4111.26) 5770.9,4124.06 ; 5770.9,4124.06 ccw(c5783.7,4136.87) 5783.7,4118.76 cw(c5783.7,4136.87) 5770.9,4124.06 ; 5770.9,4216.57 cw(c5783.7,4203.76) 5783.7,4221.87 ccw(c5783.7,4203.76) 5770.9,4216.57 ; 5770.9,4216.57 ccw(c5758.09,4229.37) 5776.2,4229.37 cw(c5758.09,4229.37) 5770.9,4216.57 ; 5770.9,4295.31 cw(c5783.7,4282.5) 5783.7,4300.61 ccw(c5783.7,4282.5) 5770.9,4295.31 ; 5770.9,4295.31 ccw(c5758.09,4308.11) 5776.2,4308.11 cw(c5758.09,4308.11) 5770.9,4295.31 ; 5770.9,4413.42 cw(c5783.7,4400.61) 5783.7,4418.72 ccw(c5783.7,4400.61) 5770.9,4413.42 ; 5770.9,4413.42 ccw(c5758.09,4426.22) 5776.2,4426.22 cw(c5758.09,4426.22) 5770.9,4413.42 ; 5776.55,3764.08 cw(c5749.2,3736.73) 5787.88,3736.73 ; 5776.55,3764.08 cw(c5749.2,3736.73) 5787.88,3736.73 ; 5776.55,3764.08 cw(c5789.08,3776.61) 5771.36,3776.61 ccw(c5789.08,3776.61) 5776.55,3764.08 ; 5776.55,3764.08 ccw(c5764.02,3751.55) 5764.02,3769.27 cw(c5764.02,3751.55) 5776.55,3764.08 ; 5787.88,3736.73 5787.88,3670 5787.88,3736.73 ; 5815.92,4340.33 cw(c5843.27,4312.98) 5843.27,4351.66 ; 5815.92,4340.33 cw(c5843.27,4312.98) 5843.27,4351.66 ; 5815.92,4340.33 ccw(c5828.45,4327.8) 5810.73,4327.8 cw(c5828.45,4327.8) 5815.92,4340.33 ; 5815.92,4340.33 cw(c5803.39,4352.86) 5803.39,4335.14 ccw(c5803.39,4352.86) 5815.92,4340.33 ; 5815.92,4655.29 ccw(c5808.74,4662.47) 5818.89,4662.47 ; 5815.92,4655.29 ccw(c5808.74,4662.47) 5818.89,4662.47 ; 5815.92,4655.29 cw(c5803.39,4667.83) 5803.39,4650.1 ccw(c5803.39,4667.83) 5815.92,4655.29 ; 5815.92,4655.29 ccw(c5828.45,4642.76) 5810.73,4642.76 cw(c5828.45,4642.76) 5815.92,4655.29 ; 5818.89,4662.47 5818.89,4710 5818.89,4662.47 ; 5843.27,4351.66 5910,4351.66 5843.27,4351.66 ; 5855.29,4039.67 ccw(c5862.47,4046.85) 5862.47,4036.7 ; 5855.29,4039.67 ccw(c5862.47,4046.85) 5862.47,4036.7 ; 5855.29,4039.67 ccw(c5842.76,4027.14) 5842.76,4044.86 cw(c5842.76,4027.14) 5855.29,4039.67 ; 5855.29,4039.67 cw(c5867.83,4052.2) 5850.1,4052.2 ccw(c5867.83,4052.2) 5855.29,4039.67 ; 5855.29,4458.44 cw(c5862.47,4451.26) 5862.47,4461.41 ; 5855.29,4458.44 cw(c5862.47,4451.26) 5862.47,4461.41 ; 5855.29,4458.44 ccw(c5867.83,4445.91) 5850.1,4445.91 cw(c5867.83,4445.91) 5855.29,4458.44 ; 5855.29,4458.44 cw(c5842.76,4470.97) 5842.76,4453.25 ccw(c5842.76,4470.97) 5855.29,4458.44 ; 5855.29,4655.29 ccw(c5848.11,4662.47) 5858.26,4662.47 ; 5855.29,4655.29 ccw(c5848.11,4662.47) 5858.26,4662.47 ; 5855.29,4655.29 cw(c5842.76,4667.83) 5842.76,4650.1 ccw(c5842.76,4667.83) 5855.29,4655.29 ; 5855.29,4655.29 ccw(c5867.83,4642.76) 5850.1,4642.76 cw(c5867.83,4642.76) 5855.29,4655.29 ; 5858.26,4662.47 5858.26,4710 5858.26,4662.47 ; 5862.47,4036.7 5910,4036.7 5862.47,4036.7 ; 5862.47,4461.41 5910,4461.41 5862.47,4461.41 ; 5899.85,4052.2 cw(c5899.85,4069.93) 5887.32,4057.4 ccw(c5899.85,4069.93) 5899.85,4052.2 ; 5899.85,4052.2 ccw(c5899.85,4034.48) 5887.32,4047.01 cw(c5899.85,4034.48) 5899.85,4052.2 ; 5899.85,4445.91 cw(c5899.85,4463.63) 5887.32,4451.1 ccw(c5899.85,4463.63) 5899.85,4445.91 ; 5899.85,4445.91 ccw(c5899.85,4428.18) 5887.32,4440.71 cw(c5899.85,4428.18) 5899.85,4445.91 ; 5900.23,4052.2 cw(c5900.23,4070.31) 5887.43,4057.51 ccw(c5900.23,4070.31) 5900.23,4052.2 ; 5900.23,4052.2 ccw(c5900.23,4034.1) 5887.43,4046.9 cw(c5900.23,4034.1) 5900.23,4052.2 ; 5900.23,4445.91 cw(c5900.23,4464.01) 5887.43,4451.21 ccw(c5900.23,4464.01) 5900.23,4445.91 ; 5900.23,4445.91 ccw(c5900.23,4427.8) 5887.43,4440.6 cw(c5900.23,4427.8) 5900.23,4445.91 ; 5527.8,4682.13 5527.8,4710 5527.8,4682.13 ; 5882.13,4052.2 5910,4052.2 5882.13,4052.2 ; 5882.13,4445.91 5910,4445.91 5882.13,4445.91